# Altium PCB PD_BQ_Ref_Design_PCB.PcbDoc (part 2 of 4)
Units mil, origin at the board's own origin, x right, y up, seen from the top; angles counter-clockwise.
Board outline 2000 x 3702.76 mil, 4 copper layers (Top Layer, Signal Layer 1, Signal Layer 2, Bottom Layer), stack 61.2 mil thick; 124 components, 53 nets, 359 pads, 494 vias.
Unrouted connection lines stored in the file: 227.
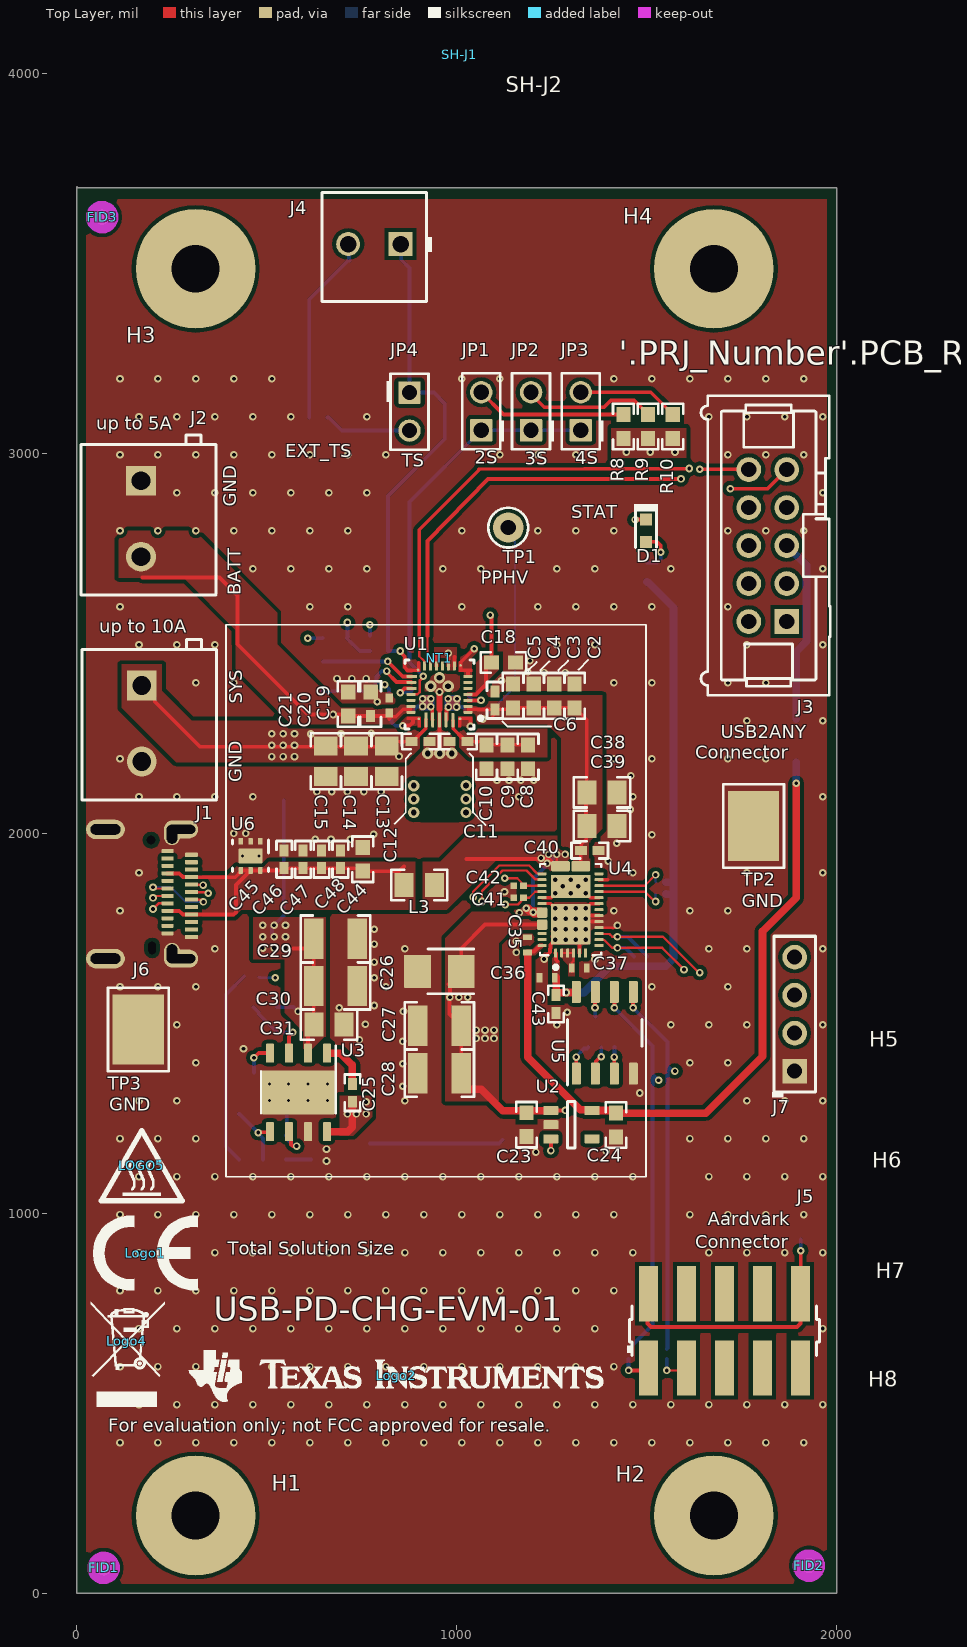
[diagram p0: Top Layer view]

## Part data (continued)
J6: library part CMP-0085712-2, "Receptacle, USB 3.1 Type C, R/A, Gold, SMT", Color=Black, Current_A=1.25A, Manufacturer="JAE Electronics", Voltage_V=20V, ComponentLink1Description="Datasheet URL", ComponentLink1URL=http://www.jae.com/z-en/pdf_download_exec.cfm?param=SJ115946.pdf, CompType=USB, ContactFinish=Gold, Gender=Female, MountType=SMT, Orientation=R/A, PackageReference="Receptacle, USB 3.1 Type C, R/A, SMT", PartNumber=DX07S024JJ2R1300, PinCount=24, Pitch_mm=0.5, RoHS=Y, Row_Count=2
J7: library part CMP-0054562-1, "Header, 100mil, 4x1, Tin, TH", Color=Black, Current_A=3A, Manufacturer="Sullins Connector Solutions", Supplier Part Number 1=S1012E-04-ND, Voltage_V=1.8kV, Cert_UL=Y, ClassName=Header, CNHeader=TRUE, ComponentLink1Description="Datasheet URL", ComponentLink1URL=http://www.sullinscorp.com/catalogs/77_PAGE108-109_.100_MALE_HDR.pdf, CompType=Header, ContactFinish=Tin, CT=FALSE, Gender=Male, Green_EU RoHS=Incomplete, Green_EU RoHS-2=Incomplete, Green_Lifecycle="Not Set", Green_REACh=Incomplete, LatestRevisionDate=26/05/2017, MountType=TH, Orientation=Vertical, PackageReference="Header, 4x1, 100mil, TH", PartNumber=PEC04SAAN, PinCount=4, Pitch_mm=2.54, Publisher="Texas Instruments", RoHS=Y, Row_Count=1, Shrouded=N, Supplier 1=Digi-Key
JP1 JP2 JP3 JP4: library part CMP-0002337-1, "Header, 100mil, 2x1, Tin, TH", Color=Black, Current_A=3A, Manufacturer="Sullins Connector Solutions", PartNumber=PEC02SAAN, Supplier Part Number 1=S1012E-02-ND, Voltage_V=1.8kV, Cert_UL=Y, ClassName=Header, CNHeader=TRUE, ComponentLink1Description="Datasheet URL", ComponentLink1URL=http://www.sullinscorp.com/catalogs/77_PAGE108-109_.100_MALE_HDR.pdf, CompType=Header, ContactFinish=Tin, CT=FALSE, Gender=Male, Green_EU RoHS=Incomplete, Green_EU RoHS-2=Incomplete, Green_Lifecycle="Not Set", Green_REACh=Incomplete, LatestRevisionDate=26/05/2017, MountType=TH, Orientation=Vertical, PackageReference="Header, 2 PIN, 100mil, Tin", PinCount=2, Pitch_mm=2.54, Publisher="Texas Instruments", RoHS=Y, Row_Count=1, Shrouded=N, Supplier 1=Digi-Key
L1: library part CMP-0063290-1, "Inductor, Shielded Drum Core, Powdered Iron, 1 uH, 7 A, 0.0181 ohm, SMD", Manufacturer=Vishay-Dale, Supplier Part Number 1=541-1218-1-ND, Value1="0.0181 ohm", Value2=7A, ValueDisplayed=1uH, AEC Category=Q200, AEC Qualified=?, ComponentLink1Description="Datasheet link", ComponentLink1URL=http://www.vishay.com/docs/34261/lp20bz11.pdf, CompType=Inductor, DCR_ohm=0.0181, Green_EU RoHS=Passed, Green_EU RoHS-2=Passed, Green_Lifecycle=Active, Green_REACh=Passed, Imax_A=7A, Ind_H=1µH, Irms="7.5A @ 40C rise", Isat="7A @ 20% inductance drop", LatestRevisionDate=2017-06-02, Material="Powdered Iron", MountType=SMT, PackageReference=5.49x2x5.18mm, PartNumber=IHLP2020BZER1R0M11, Published=2008-06-26, Publisher="Texas Instruments", RoHS=Y, SizeArea_mm2=28.4382, SizeAreaWB_mm2=53.7782, SizeX_mm=5.49, SizeY_mm=5.18, SizeZ_mm=2, Supplier 1=Digi-Key, Technology="Shielded Drum Core"
L2: library part CMP-0064124-1, "Inductor, Shielded Drum Core, Powdered Iron, 4.7 uH, 7 A, 0.015 ohm, SMD", Manufacturer="Wurth Elektronik", Supplier Part Number 1=732-3389-1-ND, Value1="0.015 ohm", Value2=7A, ValueDisplayed=4.7uH, AEC Category=Q200, AEC Qualified=?, ComponentLink1Description="Datasheet link", ComponentLink1URL=http://katalog.we-online.de/kataloge/eisos/media/pdf/74437368047.pdf, CompType=Inductor, DCR_ohm=0.015, Green_EU RoHS=Passed, Green_EU RoHS-2=Incomplete, Green_Lifecycle=Active, Green_REACh=Passed, Imax_A=7A, Ind_H=4.7µH, Irms="7A @ 40C rise", Isat="19A @ 20% inductance drop", LatestRevisionDate=2017-06-02, Material="Powdered Iron", MountType=SMT, PackageReference=10x3.8x10mm, PartNumber=74437368047, Published=2008-06-26, Publisher="Texas Instruments", RoHS=Y, SizeArea_mm2=110, SizeAreaWB_mm2=156, SizeX_mm=11, SizeY_mm=10, SizeZ_mm=4, Supplier 1=Digi-Key, Supplier 2=Newark, Supplier 3=Mouser, Supplier Part Number 2=82T3283, Supplier Part Number 3=710-74437368047, Technology="Shielded Drum Core"
L3: library part CMP-0003375-1, "Ferrite Bead, 21 ohm @ 100 MHz, 6 A, 0805", Manufacturer="Taiyo Yuden", Supplier Part Number 1=587-1765-1-ND, Value1="0.004 ohm", Value2=6A, ValueDisplayed="21 ohm", ComponentLink1Description="Datasheet link", ComponentLink1URL=http://www.yuden.co.jp/us/product/pdf/efbm_e.pdf, CompType="Ferrite Bead", DCR_ohm=4m, Imax_A=6A, LatestRevisionDate=2017-03-09, MountType=SMT, PackageReference=0805, PartNumber=FBMJ2125HM210NT, Published=2014-04-30, Publisher="Texas Instruments", RoHS=Y, SizeArea_mm2=2.5, SizeAreaWB_mm2=6.75, SizeX_mm=2, SizeY_mm=1.25, SizeZ_mm=1.45, Supplier 1=Digi-Key, ZTyp@100MHz_Ohm=21
Logo1: library part CMP-0074844-1, LatestRevisionDate=2017-07-06, Lib Reference="CE Mark", PartNumber="CE Mark", Published=2009-03-03, Publisher="Texas Instruments", SymbolCreator=a0412235
Logo2: library part CMP-0074838-1, "Texas Instrument Corporate Signature", ClassName=Logo, LatestRevisionDate=2017-07-06, Lib Reference=TI_Logo, PartNumber="Texas Instruments", Published=2009-03-03, Publisher="Texas Instruments", SymbolCreator=a0412235, SymbolVersion=2011-08-22
Logo3: library part CMP-0074847-1, "FCC_disclaimer", LatestRevisionDate=2017-07-06, Lib Reference=FCC_disclaimer, PartNumber="FCC disclaimer", Published=2009-03-03, Publisher="Texas Instruments"
Logo4: library part CMP-0074769-1, Lib Reference="WEEE logo", PartNumber="WEEE logo"
LOGO5: library part CMP-0074837-1, "IEC 61010-1 Hot Surface Warning", LatestRevisionDate=2017-07-06, Lib Reference=IEC_HotSurface, PartNumber="CAUTION HOT SURFACE", Published=2009-03-03, Publisher="Texas Instruments", SymbolCreator=a0412235, SymbolVersion=2011-08-22